# Altium PCB TL-WR703N.PcbDoc (part 2 of 3)
Units mm, origin at the board's own origin, x right, y up, seen from the top; angles counter-clockwise.
Board outline 48.52 x 50.08 mm, 2 copper layers (Top, Bottom); 241 components, 226 nets, 742 pads, 501 vias.
Unrouted connection lines stored in the file: 88.
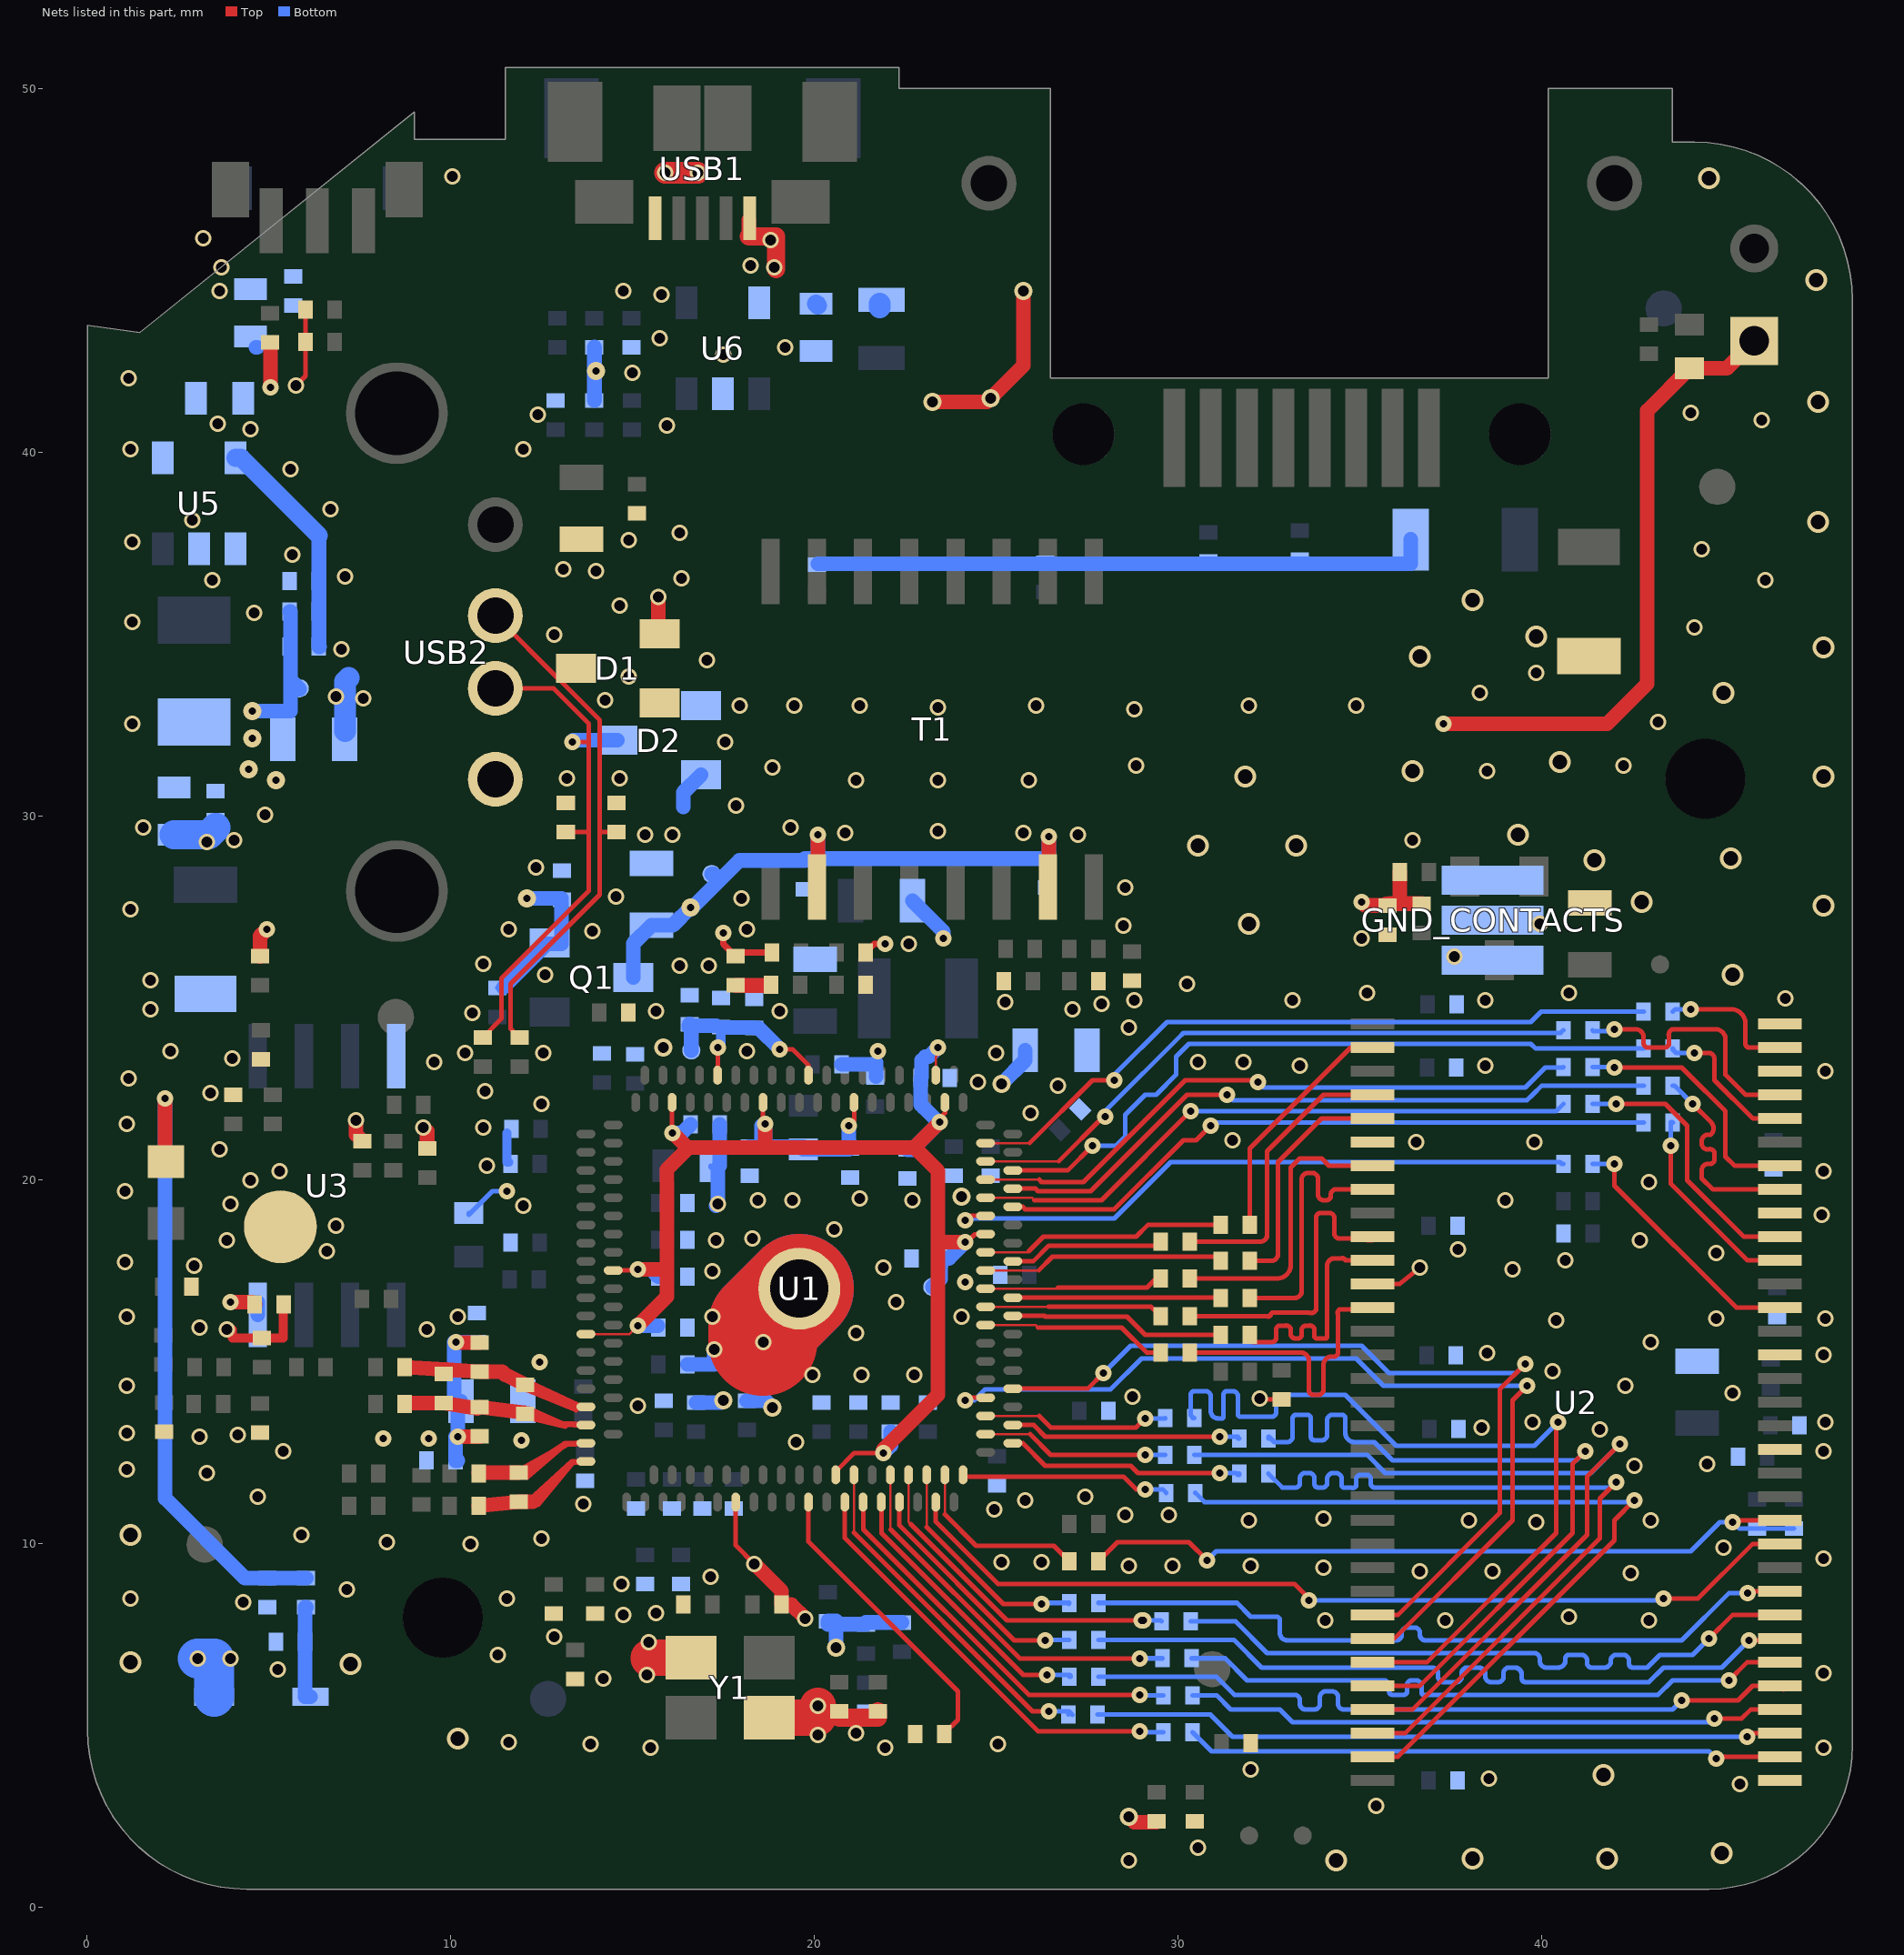
[diagram p2: the nets of this part, all layers, seen from the top]

## Via types
v1: diameter 0.45, hole 0.3, Top to Bottom, 286 vias
v2: diameter 0.45, hole 0.2, Top to Bottom, 152 vias
v3: diameter 0.6, hole 0.4, Top to Bottom, 31 vias
v4: diameter 0.5, hole 0.2, Top to Bottom, 21 vias
v5: diameter 0.5, hole 0.3, Top to Bottom, 11 vias

## Nets (pads, with @x,y where several pads share a name; then routed paths per layer and width w, separated by ;. In a path a pad name is that pad's centre, name@x,y a point inside that pad or via, vN(x,y) a via of type N, cw(c..) or ccw(c..) an arc to the next point about the centre after c; other vN are vias at no path point) (continued)
$28: C52.2 R78.1 R79.2 | length 2.5
  Top w0.127: C52.2@17.849,26.136 17.849,26.132 C52.2@17.861,26.132
  Top w0.175: v2(17.511,26.782) 17.511,26.474 C52.2@17.849,26.136 ; C52.2@17.861,26.132 17.973,26.244 R78.1@18.846,26.244 ; R79.2@21.42,26.244 21.658,26.482 v2(21.961,26.482)
+1V2: C67.2 C71.2 C73.1 C74.2 C75.1 C76.1 C77.2 C78.2 C83.1 R94.2 TP1V2.1 U1.A26 U1.A58 U1.B13 U1.B21 U1.B26 U1.B31 U1.B36 U1.B47 U1.B69 | length 48.1
  Top w0.064: U1.A58@13.731,15.75 14.929,15.75 v2(15.161,15.982) ; U1.A26@23.35,22.869 23.35,23.371 v2@23.461,23.482
  Top w0.127: U1.B47@14.481,17.5 15.179,17.5 15.211,17.532 v2(15.161,17.532) ; U1.B36@16.1,22.119 16.1,21.293 v2(16.111,21.282) ; U1.B31@18.561,22.08 U1.B31@18.6,22.119 18.6,21.593 v2(18.661,21.532) ; U1.B69@20.6,11.881 20.6,11.971 21.111,12.482 v2(21.911,12.482) ; v2(20.961,21.482) 21.111,21.632 U1.B26@21.111,21.982 ; U1.B26@21.1,22.119 21.1,21.993 U1.B26@21.111,21.982 ; U1.B26@21.111,22.132 U1.B26@21.111,21.982 ; 22.811,20.882 22.811,20.832 22.836,20.807 ; v2(23.411,23.632) 23.461,23.582 v2@23.461,23.482 ; v2(23.461,21.582) 23.361,21.582 23.611,21.832 23.611,22.132 23.611,22.13 U1.B21@23.6,22.119 ; v2(24.161,18.282) 24.211,18.282 24.421,18.492 24.711,18.492 24.711,18.482 24.719,18.49 U1.B13@24.719,18.5
  Top w0.406: v2(15.161,15.982) 15.961,16.782 15.961,17.432 ; v2(15.161,17.532) 15.211,17.532 15.961,17.532 15.961,17.432 ; v2(16.111,21.282) 16.511,20.882 16.561,20.882 ; v2(18.661,21.532) 18.661,20.882 ; v2(21.911,12.482) 21.911,12.582 23.411,14.082 23.411,18.282 ; 22.811,20.882 22.811,20.932 v2(23.461,21.582) ; 15.961,17.432 15.961,17.482 15.961,20.082 15.961,20.282 16.561,20.882 ; 16.561,20.882 18.661,20.882 ; 18.661,20.882 20.461,20.882 22.711,20.882 22.761,20.882 22.836,20.807 23.411,20.232 23.411,18.282 ; 23.411,18.282 v2(24.161,18.282) 23.411,18.282
  Bottom w0.127: C67.2@15.711,15.982 15.711,15.94 C67.2@15.721,15.93 ; C75.1@20.997,20.852 21.011,20.866 C75.1@21.011,20.882 ; 22.961,23.282 23.061,23.282 v2(23.411,23.632)
  Bottom w0.406: v2(15.161,15.982) C67.2@15.711,15.982 ; v2(15.161,17.532) 15.516,17.532 C78.2@15.721,17.327 ; v2(16.111,21.282) 16.374,21.282 C77.2@16.61,21.518 ; v2@18.561,21.482 18.561,20.902 ; 18.661,20.882 18.581,20.882 18.561,20.902 ; 18.661,20.882 v2(18.661,21.532) ; v2(20.961,21.482) C75.1@20.961,20.932 ; C75.1@21.011,20.982 21.011,20.882 C75.1@20.961,20.932 ; v2(21.911,12.482) 22.113,12.684 C71.2@22.113,13.067 ; C83.1@22.571,20.825 22.604,20.825 22.704,20.825 v2(23.461,21.582) 23.411,21.582 23.011,21.982 22.933,22.06 C74.2@22.933,22.788 22.961,22.816 22.961,23.282 ; 23.061,23.382 23.161,23.382 v2(23.411,23.632) ; TP1V2.1@23.256,17.046 23.479,17.269 C73.1@23.479,17.835 23.714,17.835 v2(24.161,18.282) ; 18.561,20.902 C76.1@18.23,20.902 18.561,20.902 ; 18.561,20.902 19.711,20.902 R94.2@19.711,20.832 20.961,20.832 C75.1@20.961,20.932
  other v2: 15.161,17.532 16.111,21.282
+2V0: C46.1 C47.1 C84.2 Q1.3 T1.2 T1.7 TP2V0.1 | length 18
  Top w0.406: T1.2@20.081,28.041 20.111,28.04 20.111,28.032 v2(20.111,29.482) ; T1.7@26.431,28.041 26.461,28.04 26.461,28.032 26.461,28.776 v2(26.461,29.432)
  Bottom w0.406: Q1.3@15.035,25.555 15.035,26.49 C84.2@15.536,26.991 16.12,26.991 v4(16.611,27.482) ; v4@16.611,27.432 v4(16.611,27.482) ; TP2V0.1@17.187,28.399 17.244,28.399 17.244,28.349 17.386,28.207 ; v2(20.111,29.482) 20.111,28.832 ; v2(26.461,29.432) 26.461,28.776 26.461,28.826 C46.1@26.404,28.826 20.111,28.826 20.111,28.832 ; v4(16.611,27.482) 16.661,27.482 17.386,28.207 ; 17.386,28.207 17.955,28.776 C47.1@19.75,28.776 19.75,28.832 19.761,28.832 20.111,28.832
+2V5: C94.2 C95.2 C101.2 R2.1 R3.1 R14.2 R82.1 TP2V5.1 U1.A33 U1.A38 | length 10.1
  Top w0.127: U1.A38@17.35,22.869 17.35,22.882 17.361,22.882 v2(17.361,23.632) ; v2(19.061,23.582) 19.411,23.582 19.85,23.143 U1.A33@19.85,22.869 ; R82.1@29.411,2.332 29.425,2.346 R82.1@29.425,2.349
  Top w0.406: v5(28.661,2.482) 28.811,2.332 R82.1@29.411,2.332
  Bottom w0.127: C101.2@16.579,24.27 16.611,24.27 C101.2@16.611,24.232 ; C95.2@17.311,24.232 17.441,24.232 C95.2@17.441,24.193 17.441,24.182 C95.2@17.461,24.182
  Bottom w0.254: v2(17.361,23.632) 17.441,23.632 C95.2@17.441,24.193
  Bottom w0.406: C101.2@16.561,24.193 16.561,24.232 16.611,24.232 C95.2@17.311,24.232 ; C101.2@16.579,24.27 16.629,24.22 TP2V5.1@16.629,23.55 ; C95.2@17.461,24.182 18.357,24.182 C94.2@18.357,24.166 18.477,24.166 v2(19.061,23.582) ; R14.2@20.385,7.771 R14.2@20.385,7.86 R14.2@20.611,7.86 ; v5(20.611,7.132) R14.2@20.611,7.86 ; R2.1@22.417,7.821 21.428,7.821 21.428,7.771 20.611,7.771 R14.2@20.611,7.86
+3V3: C4.2 C7.1 C18.1 C24.1 C38.2 C70.2 C85.2 C92.2 C106.2 C109.2 C110.1 C111.1 D1.2 D2.2 L2.1 L4.2 L14.1 LED2.A LED3.A Q1.2 R62.1 R91.1 R93.2 R95.1 R96.2 R97.2 R98.2 R99.2 R106.2 R108.2 R109.1 TP3V3.1 U3.8 | length 48.1
  Top w0.127: R91.1@5.011,42.982 5.041,43.012 R91.1@5.049,43.012 5.061,43 R91.1@5.061,42.982 ; L2.1@10.811,12.932 10.814,12.932 L2.1@10.814,12.94
  Top w0.406: v2(3.961,16.632) 4.563,16.632 C7.1@4.626,16.569 ; R62.1@4.772,26.136 4.772,26.693 v2(4.961,26.882) ; R91.1@5.011,42.982 R91.1@5.019,42.982 ; v2(5.061,41.782) R91.1@5.061,42.982 ; v2(10.161,15.532) 10.161,15.518 L4.2@10.814,15.518 ; v2@10.203,12.94 v2(10.211,12.932) L2.1@10.811,12.932 ; v1(15.719,36.022) 15.719,35.033 D1.2@15.753,34.999 ; v2(35.061,27.632) 35.16,27.533 C92.2@35.775,27.533 ; C92.2@35.726,27.582 C92.2@35.775,27.533 ; R106.2@36.11,28.453 36.11,27.582 35.761,27.582 35.775,27.568 C92.2@35.775,27.533 ; R98.2@36.714,27.583 35.825,27.583 C92.2@35.775,27.533 ; v2(37.311,32.532) 41.811,32.532 42.911,33.632 42.911,41.139 LED3.A@44.076,42.304 45.1,42.304 LED2.A@45.854,43.058
  Bottom w0.127: C106.2@5.588,34.649 5.588,34.709 C106.2@5.611,34.732 ; TP3V3.1@5.861,33.482 TP3V3.1@5.861,33.506 ; R95.1@10.511,19.082 10.511,19.032 11.161,19.682 v2(11.561,19.682) ; R93.2@11.295,25.27 11.295,25.282 R93.2@11.461,25.282 ; Q1.2@12.735,26.505 12.735,26.482 Q1.2@12.811,26.482 ; C70.2@13.061,27.732 13.073,27.732 C70.2@13.073,27.695 ; R97.2@16.756,13.867 R97.2@16.761,13.872 ; R97.2@16.761,13.872 16.761,13.882 R97.2@16.761,13.872
  Bottom w0.406: v2(3.961,16.632) 4.706,16.632 U3.8@4.706,16.276 ; v4(4.561,32.882) 5.611,32.882 5.611,33.732 ; R99.2@5.588,35.615 5.611,35.615 5.611,34.732 5.611,33.732 ; TP3V3.1@5.861,33.482 5.611,33.732 ; C85.2@10.161,13.898 C85.2@10.295,13.898 ; C24.1@10.211,12.274 C24.1@10.148,12.274 10.148,12.932 v2(10.211,12.932) C85.2@10.211,13.898 ; C18.1@10.737,15.53 10.737,15.532 v2(10.161,15.532) 10.111,15.532 10.111,13.898 C85.2@10.295,13.898 ; R93.2@11.461,25.282 12.661,26.482 12.811,26.482 13.061,26.482 13.061,27.632 13.061,27.732 v4(12.111,27.732) ; R108.2@13.962,41.422 13.962,42.183 v4(14.011,42.232) 13.962,42.281 R109.1@13.962,42.885 ; 16.41,30.242 16.41,30.642 D2.2@16.894,31.127 ; R97.2@16.756,13.867 17.446,13.867 v5(17.511,13.932) ; R96.2@18.153,13.917 18.676,13.917 v5(18.861,13.732) ; C38.2@22.709,27.664 23.561,26.812 v2(23.561,26.632) ; v5(25.161,22.632) 25.808,23.279 C4.2@25.808,23.55 ; C85.2@10.211,13.898 C85.2@10.295,13.898 ; C85.2@10.211,13.898 C85.2@10.295,13.898
  other v4: 5.211,30.982 4.461,31.282 4.561,32.132
+5V0: C107.2 C108.2 C112.1 C119.1 R113.1 U5.1 U5.4 U6.5 USB1.VBUS | length 2.3
  Top w0.406: USB1.VBUS@18.211,45.932 USB1.VBUS@18.211,46.382
  Top w0.5: USB1.VBUS@18.211,45.932 18.961,45.932 v1@18.961,45.032
  Bottom w0.406: 4.661,42.882 4.688,42.882
  Bottom w0.5: C119.1@20.061,44.082 C119.1@20.111,44.032
  Bottom w0.6: R113.1@21.811,43.982 R113.1@21.811,44.082
  other v1: 18.911,45.082 18.261,45.132 18.811,45.832
A0: R22.1 U1.A4 | length 6.4
  Top w0.127: U1.A4@25.469,13.25 26.043,13.25 26.361,12.932 v2(31.161,12.932)
  Bottom w0.127: v2(31.161,12.932) 31.661,12.932 31.661,12.882 R22.1@31.692,12.882
A0_B: R22.2 U2.29 | length 21.2
  Top w0.127: U2.29@35.355,6.075 36.654,6.075 40.861,10.282 40.861,12.182 v2(41.211,12.532)
  Bottom w0.127: R22.2@32.492,12.882 32.492,12.932 32.511,12.932 32.661,12.782 33.011,12.782 ccw(c33.011,12.932) 33.161,12.932 33.161,13.432 cw(c33.261,13.432) 33.261,13.532 33.561,13.532 cw(c33.561,13.432) 33.661,13.432 33.661,12.932 ccw(c33.761,12.932) 33.761,12.832 33.961,12.832 ccw(c33.961,12.982) 34.111,12.982 34.111,13.382 cw(c34.261,13.382) 34.261,13.532 34.511,13.532 cw(c34.511,13.432) 34.611,13.432 34.611,13.032 ccw(c34.861,13.032) 34.861,12.782 34.911,12.782 35.411,12.782 35.911,12.282 40.961,12.282 v2(41.211,12.532)
A1: R24.1 U1.B2 | length 5.2
  Top w0.064: U1.B2@24.719,13 25.943,13
  Top w0.127: 25.943,13 26.511,12.432 v2(29.111,12.432)
  Bottom w0.127: v2(29.111,12.432) 29.66,12.432 R24.1@29.66,12.424 R24.1@29.652,12.432
A1_B: R24.2 U2.30 | length 23
  Top w0.127: U2.30@35.355,5.425 36.454,5.425 41.261,10.232 41.261,11.832 v2(42.161,12.732)
  Bottom w0.127: R24.2@30.46,12.424 35.219,12.424 35.319,12.324 35.611,12.032 35.711,11.932 36.361,11.932 41.361,11.932 v2(42.161,12.732)
A2: R26.1 U1.A3 | length 6.6
  Top w0.127: U1.A3@25.469,12.75 25.743,12.75 26.361,12.132 28.711,12.132 28.911,11.932 31.111,11.932 v2(31.161,11.932)
  Bottom w0.127: v2(31.161,11.932) 31.611,11.932 31.661,11.882 31.692,11.882 R26.1@31.692,11.916
A2_B: R26.2 U2.31 | length 21.7
  Top w0.127: U2.31@35.355,4.775 36.254,4.775 41.611,10.132 41.611,11.232 v2(42.061,11.682)
  Bottom w0.127: R26.2@32.492,11.916 32.876,11.532 33.261,11.532 ccw(c33.236,11.657) 33.361,11.682 33.361,11.782 cw(c33.511,11.782) 33.511,11.932 33.611,11.932 cw(c33.611,11.782) 33.761,11.782 33.761,11.632 ccw(c33.861,11.632) 33.861,11.532 33.911,11.532 ccw(c33.961,11.682) 34.111,11.632 34.111,11.732 cw(c34.286,11.757) 34.261,11.932 34.361,11.932 cw(c34.336,11.757) 34.511,11.732 34.511,11.682 34.511,11.582 ccw(c34.586,11.607) 34.611,11.532 34.761,11.532 ccw(c34.811,11.632) 34.911,11.582 34.911,11.732 cw(c35.036,11.757) 35.011,11.882 35.211,11.882 cw(c35.186,11.757) 35.311,11.732 35.311,11.632 ccw(c35.411,11.632) 35.411,11.532 41.911,11.532 v2(42.061,11.682)
A3: R28.1 U1.B76 | length 5.8
  Top w0.127: U1.B76@24.1,11.832 U1.B76@24.1,11.881 24.149,11.832 28.511,11.832 28.861,11.482 28.911,11.482 v2(29.111,11.482)
  Bottom w0.127: v2(29.111,11.482) 29.59,11.482 R28.1@29.687,11.385
A3_B: R28.2 U2.32 | length 22.7
  Top w0.127: U2.32@35.355,4.125 35.355,4.132 36.061,4.132 42.011,10.082 42.011,10.632 v2(42.561,11.182)
  Bottom w0.127: R28.2@30.487,11.385 30.74,11.132 42.261,11.132 42.511,11.132 v2(42.561,11.182)
A4: R30.1 U1.A80 | length 12
  Top w0.127: U1.A80@20.85,11.131 20.85,10.143 26.161,4.832 v2(28.961,4.832)
  Bottom w0.127: v2(28.961,4.832) 28.989,4.804 R30.1@29.61,4.804
A4_B: R30.2 U2.35 | length 16.5
  Top w0.127: v2(44.811,4.082) 44.854,4.125 U2.35@46.555,4.125
  Bottom w0.127: R30.2@30.41,4.804 30.932,4.282 43.911,4.282 44.611,4.282 v2(44.811,4.082)
A5: R32.1 U1.B70 | length 9.8
  Top w0.064: 21.1,10.293 U1.B70@21.1,11.881
  Top w0.127: 21.1,10.293 26.011,5.382 v2(26.461,5.382)
  Bottom w0.127: v2(26.461,5.382) R32.1@27.011,5.382 ; R32.1@26.997,5.289 26.997,5.368 R32.1@27.011,5.382 ; R32.1@27.111,5.282 R32.1@27.011,5.382
A5_B: R32.2 U2.36 | length 19
  Top w0.127: v2(45.661,4.682) 45.754,4.775 U2.36@46.555,4.775
  Bottom w0.127: R32.2@27.797,5.289 30.904,5.289 30.911,5.282 31.511,4.682 v2(45.661,4.682)
A6: R34.1 U1.A81 | length 10.9
  Top w0.127: U1.A81@21.35,11.131 21.361,11.12 21.361,10.382 25.911,5.832 v2(28.961,5.832)
  Bottom w0.127: R34.1@29.61,5.82 v2@28.973,5.82 ; v2@28.973,5.82 v2(28.961,5.832) v2@28.973,5.82
A6_B: R34.2 U2.37 | length 16.6
  Top w0.127: v2(44.761,5.182) 45.511,5.182 45.754,5.425 U2.37@46.555,5.425
  Bottom w0.127: R34.2@30.41,5.82 31.073,5.82 31.461,5.432 32.811,5.432 33.161,5.082 44.661,5.082 v2(44.761,5.182)
A7: R36.1 U1.A82 | length 7.7
  Top w0.127: U1.A82@21.85,11.131 U1.A82@21.86,11.131 ; v2(26.411,6.382) 25.761,6.382 21.861,10.282 U1.A82@21.861,11.132 ; U1.A82@21.86,11.131 U1.A82@21.861,11.132
  Bottom w0.127: v2(26.411,6.382) 27.011,6.382 cw(c27.011,6.332) 27.061,6.332 27.057,6.328 R36.1@27.02,6.328
A7_B: R36.2 U2.38 | length 20.6
  Top w0.127: v2(43.861,5.682) 45.411,5.682 45.761,6.032 45.811,6.082 46.561,6.082 46.561,6.032 U2.38@46.661,6.032 ; U2.38@46.555,6.075 46.661,6.075 U2.38@46.661,6.032 ; U2.38@46.661,5.982 U2.38@46.661,6.032
  Bottom w0.127: R36.2@27.82,6.328 31.065,6.328 31.561,5.832 33.211,5.832 cw(c33.211,5.682) 33.361,5.682 33.361,5.582 ccw(c33.511,5.582) 33.511,5.432 33.761,5.432 ccw(c33.761,5.582) 33.911,5.582 33.911,5.732 cw(c34.086,5.757) 34.061,5.932 34.211,5.932 cw(c34.236,5.757) 34.411,5.782 34.411,5.582 ccw(c34.561,5.582) 34.561,5.432 43.611,5.432 v2(43.861,5.682)
A8: R38.1 U1.B72 | length 10.4
  Top w0.064: U1.B72@22.1,11.881 22.1,10.393 22.111,10.382
  Top w0.127: 22.111,10.382 25.661,6.832 v2(28.961,6.832)
  Bottom w0.127: v2(28.961,6.832) 28.965,6.836 R38.1@29.583,6.836
A8_B: R38.2 U2.39 | length 17.7
  Top w0.127: v2(45.161,6.232) 45.654,6.725 U2.39@46.555,6.725
  Bottom w0.127: R38.2@30.383,6.836 31.307,6.836 31.911,6.232 35.661,6.232 cw(c35.661,6.082) 35.811,6.082 35.811,5.932 ccw(c35.911,5.932) 35.911,5.832 36.211,5.832 ccw(c36.211,5.932) 36.311,5.932 36.311,6.082 cw(c36.436,6.107) 36.411,6.232 36.561,6.232 cw(c36.536,6.057) 36.711,6.032 36.711,5.882 ccw(c36.761,5.882) 36.761,5.832 43.211,5.832 43.611,6.232 v2(45.161,6.232)
A9: R40.1 U1.A83 | length 6.6
  Top w0.127: U1.A83@22.35,11.131 22.35,10.493 25.511,7.332 v2(26.361,7.332)
  Bottom w0.127: v2(26.361,7.332) 26.349,7.344 R40.1@27.02,7.344
A9_B: R40.2 U2.40 | length 20.9
  Top w0.127: v2(45.711,7.332) 46.461,7.332 46.555,7.332 U2.40@46.555,7.375
  Bottom w0.127: R40.2@27.82,7.344 31.549,7.344 32.311,6.582 37.011,6.582 cw(c36.986,6.407) 37.161,6.382 37.161,6.332 ccw(c37.311,6.332) 37.311,6.182 37.661,6.182 ccw(c37.661,6.332) 37.811,6.332 37.811,6.432 cw(c37.961,6.432) 37.961,6.582 38.261,6.582 cw(c38.261,6.382) 38.461,6.382 38.461,6.332 ccw(c38.611,6.332) 38.611,6.182 38.811,6.182 ccw(c38.811,6.332) 38.961,6.332 38.961,6.432 cw(c39.111,6.432) 39.111,6.582 39.261,6.582 cw(c39.261,6.382) 39.461,6.382 39.461,6.282 ccw(c39.561,6.282) 39.561,6.182 42.961,6.182 43.361,6.582 44.961,6.582 v2(45.711,7.332)
A10/AP: R42.1 U1.B3 | length 5.2
  Top w0.064: U1.B3@24.719,13.5 26.193,13.5
  Top w0.127: 26.193,13.5 26.511,13.182 28.861,13.182 v2(29.111,13.432)
  Bottom w0.127: v2(29.111,13.432) 29.561,13.432 29.66,13.432 R42.1@29.66,13.44
A10_B/AP_B: R42.2 U2.28 | length 23.6
  Top w0.127: U2.28@35.355,6.725 36.854,6.725 40.411,10.282 40.411,13.282 v2(40.461,13.332)
  Bottom w0.127: R42.2@30.46,13.44 30.411,13.44 30.411,13.482 cw(c30.411,13.532) 30.361,13.532 30.361,14.082 cw(c30.461,14.082) 30.461,14.182 30.761,14.182 cw(c30.761,14.032) 30.911,14.032 30.911,13.632 ccw(c31.111,13.632) 31.111,13.432 31.211,13.432 ccw(c31.211,13.482) 31.261,13.482 31.261,14.082 cw(c31.361,14.082) 31.361,14.182 31.511,14.182 cw(c31.511,14.032) 31.661,14.032 31.661,13.532 ccw(c31.711,13.532) 31.711,13.482 32.561,13.482 ccw(c32.586,13.607) 32.711,13.582 32.711,13.782 cw(c33.011,13.782) 33.011,14.082 34.611,14.082 36.011,12.682 39.811,12.682 v2(40.461,13.332)
A11: R44.1 U1.B73 | length 9.4
  Top w0.064: U1.B73@22.6,11.881 22.6,10.593 22.661,10.532
  Top w0.127: 22.661,10.532 25.311,7.882 v2(29.061,7.882)
  Bottom w0.127: v2(29.011,7.882) v2(29.061,7.882) 29.53,7.882 R44.1@29.56,7.852
A11_B: R44.2 U2.41 | length 18.3
  Top w0.127: v2(44.611,7.382) 45.254,8.025 U2.41@46.555,8.025
  Bottom w0.127: R44.2@30.36,7.852 31.591,7.852 32.461,6.982 39.661,6.982 39.811,6.982 cw(c39.786,6.807) 39.961,6.782 39.961,6.732 ccw(c40.136,6.757) 40.161,6.582 40.461,6.582 ccw(c40.461,6.782) 40.661,6.782 40.661,6.832 cw(c40.761,6.832) 40.761,6.932 41.061,6.932 cw(c41.086,6.757) 41.261,6.782 41.261,6.732 ccw(c41.386,6.707) 41.361,6.582 41.761,6.582 ccw(c41.736,6.757) 41.911,6.782 cw(c42.061,6.782) 42.061,6.932 42.211,6.932 cw(c42.236,6.757) 42.411,6.782 42.411,6.682 ccw(c42.511,6.682) 42.511,6.582 42.911,6.582 43.261,6.932 44.161,6.932 v2(44.611,7.382)
A12: R46.1 U1.B74 | length 6.3
  Top w0.064: 23.1,10.443 U1.B74@23.1,11.881
  Top w0.127: 23.1,10.443 25.211,8.332 v2(26.261,8.332)
  Bottom w0.127: v2(26.261,8.332) 26.289,8.36 26.983,8.36 27.011,8.332 27.011,8.351 R46.1@27.02,8.36
A12_B: R46.2 U2.42 | length 20.4
  Top w0.127: v2(45.668,8.625) 45.661,8.625 45.661,8.632 45.704,8.675 U2.42@46.555,8.675
  Bottom w0.127: R46.2@27.82,8.36 31.633,8.36 32.011,7.982 32.711,7.982 cw(c32.711,7.882) 32.811,7.882 32.811,7.532 ccw(c33.011,7.532) 33.011,7.332 36.011,7.332 ccw(c36.011,7.482) 36.161,7.482 36.161,7.532 cw(c36.311,7.532) 36.311,7.682 36.511,7.682 cw(c36.511,7.532) 36.661,7.532 36.661,7.482 ccw(c36.811,7.482) 36.811,7.332 36.861,7.332 43.861,7.332 45.154,8.625 v2(45.668,8.625)
ANT1: AN1.RF C29.2 C32.2 | length 2.6
  Bottom w0.406: C29.2@6.038,8.241 6.007,8.241 C32.2@6.007,7.294 6.007,5.782 AN1.RF@6.161,5.782
ANT1_INN: C33.2 L8.1 U1.A64 | length 6.3
  Top w0.127: C33.2@11.88,11.939 11.961,11.939 C33.2@11.961,12.032
  Top w0.175: C33.2@12.011,11.982 13.161,12.732 12.111,11.832 11.961,12.032 13.211,12.732 U1.A64@13.731,12.75
  Top w0.406: L8.1@10.783,11.92 10.783,11.939 L8.1@10.868,11.939 ; L8.1@10.861,11.932 L8.1@10.868,11.939 ; C33.2@11.88,11.939 L8.1@10.868,11.939
ANT1_INP: C33.1 L6.1 U1.A65 | length 7.2
  Top w0.127: C33.1@11.88,11.139 11.88,11.182 12.211,11.182
  Top w0.175: 12.411,11.082 13.361,12.232 ; U1.A65@13.731,12.25 13.361,12.232 ; 13.361,12.232 12.211,11.032 12.211,11.182 13.361,12.232
  Top w0.406: L6.1@10.783,11.031 11.941,11.139 C33.1@11.88,11.139 12.268,11.139
ANT1_INT: C29.1 C31.1 J1.2 | length 17.7
  Top w0.406: v2(2.161,22.232) 2.161,20.49 J1.2@2.182,20.49
  Bottom w0.406: v2@2.161,22.132 2.161,21.982 ; v2(2.161,22.232) 2.161,21.982 ; C31.1@5.061,9.032 C31.1@5.07,9.041 ; C29.1@6.038,9.041 C31.1@5.07,9.041 ; 2.161,21.982 2.161,11.232 4.352,9.041 4.972,9.041 C31.1@5.07,9.041
ANT1_OUTN: C22.2 C23.2 C25.2 L4.1 U1.A62 | length 9
  Top w0.127: C22.2@12.011,14.382 12.027,14.382 C22.2@12.057,14.352 12.07,14.352 C22.2@12.071,14.353
  Top w0.175: U1.A62@13.731,13.75 13.511,13.782 12.011,14.482 12.111,14.232 13.461,13.682 12.071,14.353 C22.2@12.011,14.382 ; C22.2@12.011,14.382 12.011,14.432 C22.2@12.011,14.382
  Top w0.406: C25.2@8.751,14.841 C23.2@9.916,14.772 ; C23.2@9.825,14.656 9.916,14.656 C23.2@9.916,14.772 ; C22.2@12.011,14.382 11.511,14.632 11.425,14.718 L4.1@10.814,14.718 C23.2@9.916,14.772
ANT1_OUTP: C19.2 C22.1 C23.1 L2.2 U1.A63 | length 7.5
  Top w0.127: C22.1@12.057,13.552 12.057,13.582 C22.1@12.111,13.582
  Top w0.175: C22.1@12.111,13.582 13.161,13.232 12.111,13.482 12.161,13.682 13.061,13.282 U1.A63@13.731,13.25
  Top w0.406: C19.2@8.751,13.825 8.751,13.856 C23.1@9.825,13.856 10.748,13.706 10.814,13.74 12.019,13.59 C22.1@12.057,13.552
BA0: U1.A6 U2.26 | length 24.1
  Top w0.127: U1.A6@25.469,14.25 27.529,14.25 v2(27.961,14.682) ; U2.26@35.355,8.025 36.054,8.025 38.861,10.832 38.861,14.232 v2(39.561,14.932)
  Bottom w0.127: v2(27.961,14.682) 28.711,15.432 35.061,15.432 35.811,14.682 38.461,14.682 39.311,14.682 v2(39.561,14.932)
BA1: U1.B4 U2.27 | length 25.9
  Top w0.127: v2(24.161,13.932) 24.229,14 U1.B4@24.719,14 ; U2.27@35.355,7.375 35.954,7.375 39.211,10.632 39.211,13.932 v2(39.611,14.332)
  Bottom w0.127: v2(24.161,13.932) 24.411,13.932 24.711,14.232 28.161,14.232 29.011,15.082 34.911,15.082 35.661,14.332 v2(39.611,14.332)
CKE: U1.A85 U2.44 | length 25.3
  Top w0.127: U1.A85@23.35,11.131 23.35,10.593 25.061,8.882 33.211,8.882 33.611,8.482 v2(33.611,8.432) ; v2(43.361,8.482) 44.311,8.482 45.704,9.875 45.804,9.975 U2.44@46.555,9.975
  Bottom w0.127: v2(33.611,8.432) 43.361,8.432 v2(43.361,8.482)
CLK: R56.1 U1.B75 | length 5
  Top w0.064: 23.6,10.793 U1.B75@23.6,11.881
  Top w0.127: 23.6,10.793 24.461,9.932 26.595,9.932 R56.1@27.02,9.507
CLK_B: C6.1 R55.1 R56.2 U2.45 | length 21.4
  Top w0.127: R56.2@27.82,9.507 28.345,10.032 30.311,10.032 v2(30.811,9.532) ; v2(45.261,10.582) 45.304,10.625 U2.45@46.555,10.625
  Bottom w0.127: v2(30.811,9.532) 31.061,9.782 31.161,9.782 43.761,9.782 44.111,9.782 44.911,10.582 45.111,10.582 v2(45.261,10.582) 45.443,10.4 C6.1@45.931,10.4 R55.1@46.947,10.4
D+: D2.3 R101.1 R104.1 USB2.3 | length 15.3
  Top w0.127: R101.1@10.891,23.9 11.411,24.42 11.411,25.532 13.811,27.932 13.811,29.55 ; USB2.3@11.241,33.502 12.841,33.502 13.811,32.532 13.811,31.982 ; R104.1@13.177,29.55 13.811,29.55 ; v2(13.361,32.032) 13.811,32.032 13.811,31.982 ; 13.811,29.55 13.811,29.582 ; 13.811,29.55 13.811,29.582 ; 13.811,29.582 13.811,29.65 13.811,31.982
  Bottom w0.406: v2(13.361,32.032) 13.356,32.037 13.343,32.037 13.382,32.077 D2.3@14.594,32.077
D-: D1.3 R102.1 R103.1 USB2.2 | length 15.4
  Top w0.127: USB2.2@11.241,35.502 D1.3@13.011,33.732 ; R102.1@11.907,23.9 11.661,24.146 11.661,25.382 14.111,27.832 14.111,29.582 ; D1.3@13.361,33.982 13.511,33.982 13.011,33.982 D1.3@13.011,33.732 ; R103.1@14.574,29.55 14.111,29.55 14.111,29.582 ; D1.3@13.011,33.732 13.036,33.707 14.111,32.632 14.111,32.582 14.111,29.582
  Top w0.406: D1.3@13.511,33.982 D1.3@13.511,34.041
DQ0: R21.2 U1.B12 | length 6.8
  Top w0.064: U1.B12@24.719,18 25.879,18 25.911,18.032
  Top w0.127: 25.911,18.032 26.311,18.432 28.861,18.432 29.18,18.751 R21.2@31.184,18.751
DQ0_B: R21.1 U2.2 | length 6.6
  Top w0.127: R21.1@31.984,18.751 31.984,20.855 34.761,23.632 35.311,23.632 35.318,23.625 U2.2@35.355,23.625
DQ1: R23.2 U1.A13 | length 4.3
  Top w0.127: U1.A13@25.469,17.75 26.029,17.75 26.461,18.182 29.422,18.182 R23.2@29.533,18.293
DQ1_B: R23.1 U2.4 | length 8.4
  Top w0.127: R23.1@30.333,18.293 32.272,18.293 ccw(c32.272,18.482) 32.461,18.482 32.461,20.782 33.961,22.282 34.011,22.332 U2.4@35.011,22.332 ; U2.4@35.355,22.325 U2.4@35.361,22.331 ; U2.4@35.011,22.332 35.361,22.332 U2.4@35.011,22.332
DQ2: R25.2 U1.B11 | length 6.7
  Top w0.064: U1.B11@24.719,17.5 26.179,17.5
  Top w0.127: 26.179,17.5 26.561,17.882 31.064,17.882 R25.2@31.184,17.762
DQ2_B: R25.1 U2.5 | length 6.9
  Top w0.127: R25.1@31.984,17.762 32.591,17.762 ccw(c32.566,17.957) 32.761,17.982 32.761,20.482 33.961,21.682 U2.5@35.011,21.682 ; U2.5@35.355,21.675 U2.5@35.361,21.681 ; U2.5@35.011,21.682 U2.5@35.361,21.682 ; U2.5@35.011,21.682 35.261,21.682 35.311,21.682 U2.5@35.361,21.682
DQ3: R27.2 U1.B10 | length 4.9
  Top w0.064: U1.B10@24.719,17 26.679,17 26.711,17.032
  Top w0.127: 26.711,17.032 29.161,17.032 29.406,17.277 R27.2@29.533,17.277
DQ3_B: R27.1 U2.7 | length 8.1
  Top w0.127: R27.1@30.333,17.277 32.706,17.277 ccw(c32.731,17.657) 33.111,17.632 33.111,20.332 33.361,20.582 33.961,20.582 34.161,20.382 34.168,20.375 U2.7@35.355,20.375
DQ4: R29.2 U1.A11 | length 5.7
  Top w0.127: U1.A11@25.469,16.75 31.18,16.75 R29.2@31.184,16.746
DQ4B: R29.1 U2.8 | length 7.8
  Top w0.127: R29.1@31.984,16.746 33.225,16.746 ccw(c33.225,16.932) 33.411,16.932 33.411,20.032 cw(c33.586,20.007) 33.611,20.182 33.711,20.182 cw(c33.686,20.007) 33.861,19.982 33.861,19.582 ccw(c34.011,19.582) 34.011,19.432 34.111,19.432 ccw(c34.086,19.557) 34.211,19.582 cw(c34.361,19.582) 34.361,19.732 U2.8@35.011,19.732 ; U2.8@35.355,19.725 35.348,19.732 U2.8@35.011,19.732 ; U2.8@35.361,19.732 U2.8@35.011,19.732
DQ5: R31.2 U1.B9 | length 4.9
  Top w0.064: U1.B9@24.719,16.5 26.443,16.5 26.461,16.482
  Top w0.127: 26.443,16.5 29.271,16.5 R31.2@29.533,16.238
DQ5_B: R31.1 U2.10 | length 8.4
  Top w0.127: R31.1@30.333,16.238 32.467,16.238 ccw(c32.492,16.307) 32.561,16.282 cw(c32.617,16.282) 32.617,16.338 32.667,16.338 33.617,16.338 ccw(c33.667,16.482) 33.811,16.432 33.811,18.932 cw(c33.936,18.957) 33.911,19.082 34.161,19.082 cw(c34.161,18.932) 34.311,18.932 34.311,18.482 ccw(c34.461,18.532) 34.511,18.382 35.161,18.382 cw(c35.161,18.332) 35.211,18.332 35.355,18.332 U2.10@35.355,18.425
DQ6: R33.2 U1.A10 | length 5.9
  Top w0.127: U1.A10@25.469,16.25 26.343,16.25 26.361,16.232 28.611,16.232 29.111,15.732 29.113,15.73 R33.2@31.184,15.73
DQ6_B: R33.1 U2.11 | length 6.8
  Top w0.127: R33.1@31.984,15.73 31.984,15.655 31.961,15.632 32.061,15.532 32.261,15.532 32.611,15.532 ccw(c32.586,15.657) 32.711,15.682 32.711,15.882 cw(c32.811,15.882) 32.811,15.982 32.961,15.982 cw(c32.986,15.857) 33.111,15.882 33.111,15.782 ccw(c33.236,15.757) 33.211,15.632 33.311,15.632 ccw(c33.311,15.732) 33.411,15.732 33.411,15.832 cw(c33.536,15.857) 33.511,15.982 33.611,15.982 cw(c33.636,15.857) 33.761,15.882 33.761,15.732 ccw(c33.836,15.707) 33.811,15.632 34.061,15.632 ccw(c34.061,15.682) 34.111,15.682 34.111,17.632 cw(c34.311,17.632) 34.311,17.832 34.511,17.832 cw(c34.536,17.757) 34.611,17.782 34.611,17.775 U2.11@35.355,17.775
DQ7: R35.2 U1.B8 | length 5.1
  Top w0.064: U1.B8@24.719,16 26.093,16 26.161,15.932
  Top w0.127: 26.161,15.932 28.461,15.932 29.148,15.245 R35.2@29.533,15.245
DQ7_B: R35.1 U2.13 | length 8.2
  Top w0.127: R35.1@30.333,15.245 33.398,15.245 cw(c33.373,15.007) 33.611,14.982 33.611,14.182 ccw(c33.736,14.207) 33.761,14.082 33.861,14.082 ccw(c33.861,14.232) 34.011,14.232 34.011,14.932 cw(c34.236,14.907) 34.261,15.132 ccw(c34.286,15.257) 34.411,15.232 34.411,16.282 cw(c34.511,16.332) 34.461,16.432 35.161,16.432 ccw(c35.161,16.482) 35.211,16.482 35.355,16.482 U2.13@35.355,16.475
DQ8: R37.1 U1.B14 | length 17.7
  Top w0.127: v2(24.161,18.882) 24.279,19 U1.B14@24.719,19
  Bottom w0.127: v2(24.161,18.882) 24.211,18.932 28.261,18.932 29.811,20.482 40.511,20.482 40.561,20.432 40.598,20.432 R37.1@40.605,20.425
DQ8_B: R37.2 U2.54 | length 7.2
  Top w0.127: v2(42.011,20.432) 42.011,19.832 45.361,16.482 ; U2.54@46.555,16.475 45.368,16.475 ; 45.361,16.482 45.368,16.475 ; 45.361,16.482 45.368,16.475 ; 45.361,16.482 45.368,16.475
  Bottom w0.127: R37.2@41.405,20.425 v2@42.004,20.425 ; v2(42.011,20.432) v2@42.004,20.425 ; v2(42.011,20.432) v2@42.004,20.425
DQ9: R39.1 U1.A16 | length 18.4
  Top w0.127: U1.A16@25.469,19.25 25.743,19.25 25.811,19.182 28.261,19.182 30.161,21.082 30.511,21.082 v2(30.911,21.482)
  Bottom w0.127: v2(30.911,21.482) 30.961,21.482 31.047,21.568 R39.1@42.814,21.568
DQ9_B: R39.2 U2.56 | length 5.6
  Top w0.127: v2(43.561,20.932) 43.561,20.832 43.561,19.882 45.668,17.775 U2.56@46.555,17.775
  Bottom w0.127: v2(43.561,20.932) 43.561,21.582 43.6,21.582 R39.2@43.614,21.568
DQ10: R41.1 U1.B15 | length 17
  Top w0.064: U1.B15@24.719,19.5 25.993,19.5 26.061,19.432
  Top w0.127: 26.061,19.432 27.911,19.432 v2(30.361,21.882)
  Bottom w0.127: v2(30.361,21.882) 30.461,21.882 40.211,21.882 40.411,21.882 R41.1@40.605,22.076
DQ10_B: R41.2 U2.57 | length 7.6
  Top w0.127: v2@42.061,22.082 43.411,22.082 44.011,21.482 44.011,19.982 45.568,18.425 U2.57@46.555,18.425
  Bottom w0.127: R41.2@41.405,22.076 v2@42.055,22.076 ; v2@42.055,22.076 v2(42.061,22.082) v2@42.055,22.076
DQ11: R43.1 U1.A17 | length 18.8
  Top w0.127: U1.A17@25.469,19.75 26.093,19.75 26.161,19.682 27.611,19.682 30.261,22.332 v2(31.361,22.332) v2@31.461,22.332
  Bottom w0.127: v2(31.361,22.332) 31.511,22.182 31.811,22.182 ; R43.1@42.814,22.584 40.013,22.584 39.761,22.332 39.611,22.182 32.161,22.182 31.861,22.182 ; 31.811,22.182 31.861,22.182 ; 31.811,22.182 31.861,22.182
DQ11_B: R43.2 U2.59 | length 6
  Top w0.127: v2(44.161,22.082) 44.661,21.582 cw(c44.486,21.407) 44.661,21.232 44.561,21.232 ccw(c44.586,21.057) 44.411,21.032 44.411,20.982 ccw(c44.561,20.982) 44.561,20.832 44.611,20.832 cw(c44.636,20.707) 44.761,20.732 44.761,20.532 cw(c44.636,20.557) 44.611,20.432 ccw(c44.586,20.257) 44.411,20.282 44.411,20.032 44.718,19.725 U2.59@46.555,19.725
  Bottom w0.127: R43.2@43.614,22.584 43.659,22.584 v2(44.161,22.082)
DQ12: R45.1 U1.B16 | length 17.5
  Top w0.064: U1.B16@24.719,20 26.193,20
  Top w0.127: 26.193,20 26.261,19.932 27.411,19.932 30.211,22.732 32.261,22.732 v2(32.211,22.682)
  Bottom w0.127: v2(32.211,22.682) 32.361,22.532 39.561,22.532 40.111,23.082 40.561,23.082 40.595,23.082 R45.1@40.605,23.092
DQ12_B: R45.2 U2.60 | length 7
  Top w0.127: v2(42.011,23.082) 43.861,23.082 44.011,22.932 45.061,21.882 45.061,20.632 45.318,20.375 U2.60@46.555,20.375
  Bottom w0.127: R45.2@41.405,23.092 42.001,23.092 v2(42.011,23.082)
DQ13: R47.1 U1.A18 | length 19.5
  Top w0.127: U1.A18@25.469,20.25 26.979,20.25 v2(27.661,20.932)
  Bottom w0.127: v2(27.661,20.932) 28.311,20.932 28.361,20.982 28.561,21.182 28.561,21.782 29.111,22.332 29.411,22.332 29.961,22.882 29.961,23.382 30.311,23.732 39.711,23.732 39.843,23.6 R47.1@42.814,23.6
DQ13_B: R47.2 U2.62 | length 4.1
  Top w0.127: v2(44.211,23.482) 44.611,23.482 cw(c44.586,23.307) 44.761,23.282 44.761,22.732 45.818,21.675 U2.62@46.555,21.675
  Bottom w0.127: R47.2@43.614,23.6 43.614,23.585 43.611,23.582 43.711,23.482 v2(44.211,23.482)
DQ14: R48.1 U1.B17 | length 17.5
  Top w0.064: U1.B17@24.719,20.5 26.729,20.5
  Top w0.127: 26.729,20.5 27.961,21.732 v2(28.011,21.732)
  Bottom w0.127: v2(28.011,21.732) 28.011,21.882 30.137,24.008 30.161,24.032 ; 30.111,23.982 30.161,24.032 ; R48.1@40.605,24.108 40.529,24.032 30.161,24.032
DQ14_B: R48.2 U2.63 | length 7.4
  Top w0.127: v2(42.011,24.132) 42.561,24.132 cw(c42.586,23.907) 42.811,23.932 42.811,23.732 ccw(c42.936,23.757) 42.961,23.632 43.411,23.632 ccw(c43.386,23.757) 43.511,23.782 43.511,23.932 cw(c43.661,23.982) 43.611,24.132 44.761,24.132 cw(c44.786,23.857) 45.061,23.882 45.061,22.882 45.618,22.325 U2.63@46.555,22.325
  Bottom w0.127: R48.2@41.405,24.108 41.431,24.082 42.061,24.082 v2(42.011,24.132)
DQ15: R49.1 U1.B18 | length 19.7
  Top w0.064: U1.B18@24.719,21 25.929,21
  Top w0.127: 25.929,21 27.661,22.732 v2(28.261,22.732)
  Bottom w0.127: v2(28.261,22.732) 28.261,22.882 29.711,24.332 39.711,24.332 39.995,24.616 R49.1@42.814,24.616
DQ15_B: R49.2 U2.65 | length 3.8
  Top w0.127: v2(44.111,24.682) 45.211,24.682 cw(c45.211,24.282) 45.611,24.282 45.611,23.732 ccw(c45.718,23.732) 45.718,23.625 U2.65@46.555,23.625
  Bottom w0.127: R49.2@43.614,24.616 43.68,24.682 v2(44.111,24.682)
ETH_GND: C45.2 R64.1 R65.2 R68.2 R71.1 | length 17.5
  Bottom w0.127: R64.1@20.081,36.904 20.083,36.904 R64.1@20.111,36.932 ; R71.1@26.354,36.954 26.354,36.932 R71.1@26.461,36.932 ; R65.2@30.849,36.993 30.861,36.993 R65.2@30.861,36.932 ; R68.2@33.362,37.043 33.473,36.932 R68.2@33.561,36.932
  Bottom w0.406: R64.1@20.111,36.932 R71.1@26.461,36.932 ; C45.2@36.407,37.597 36.407,36.932 35.792,36.932 35.507,36.932 33.561,36.932 30.861,36.932 30.811,36.932 R71.1@26.554,36.932 ; R71.1@26.461,36.932 R71.1@26.554,36.932 ; R71.1@26.461,36.932 R71.1@26.554,36.932
FB: C106.1 R99.1 R100.2 U5.5 | length 6.3
  Bottom w0.406: 6.388,37.705 R100.2@6.388,36.454 R99.1@6.388,35.615 C106.1@6.388,34.649 C106.1@6.411,34.649
  Bottom w0.5: U5.5@4.094,39.836 4.257,39.836 6.388,37.705
GND: AN1.GND C1.2 C2.2 C3.2 C4.1 C5.2 C7.2 C8.2 C9.1 C10.1 C11.1 C12.1 C13.1 C14.1 C15.2 C16.1 C17.1 C18.2 C20.1 C21.1 C24.2 C30.2 C31.2 C32.1 C35.1 C36.1 C37.1 C46.2 C47.2 C48.1 C49.2 C50.1 C51.1 C52.1 C53.2 C55.2 C57.1 C60.1 C61.2 C62.1 C63.1 C64.1 C65.2 C66.1 C67.1 C70.1 C71.1 C72.1 C73.2 C74.1 C75.2 C76.2 C77.1 C78.1 C79.2 C80.2 C81.1 C82.1 C83.2 C84.1 C85.1 C86.1 C87.2 C88.2 C89.2 C90.2 C91.1 C92.1 C93.1 C94.1 C95.1 C96.1 C97.2 C98.2 C99.1 C100.1 C101.1 C102.1 C103.2 C104.2 C105.2 C107.1 C108.1 C109.1 C110.2 C111.2 C112.2 C113.1 C114.2 C115.1 C119.2 D1.1 D2.1 GND.1 GND_CONTACTS.GND$1 GND_CONTACTS.GND$2 GND_CONTACTS.GND$3 L5.2 L11.1 R4.2 R7.2 R11.1 R12.1 R13.2 R15.1 R17.1 R20.2 R52.2 R53.1 R60.1 R61.2 R63.2 R92.1 R100.1 R103.2 R104.2 R110.2 R111.1 TPGND.1 U1.A74 U1.PAD U2.6 U2.12 U2.34 U2.48 U2.52 U2.58 U2.64 U2.66 U3.4 U5.2 U6.2 USB1.GND USB2.4 Y1.2 Y1.4 | length 38.2
  Top w0.127: v1(5.761,41.832) 6.023,42.094 C62.1@6.023,43.92 R92.1@6.023,43.031 ; R15.1@7.561,21.082 7.561,21.056 R15.1@7.589,21.056 ; U1.A74@17.85,11.131 17.85,9.943 v1(18.361,9.432) ; C48.1@18.811,25.382 18.811,25.355 C48.1@18.819,25.355 ; v1(32.261,13.982) 32.261,13.956 R52.2@32.854,13.956 ; U2.12@35.355,17.125 36.104,17.125 v1(36.661,17.582)
  Top w0.254: v1@4.011,15.882 4.011,15.645 4.822,15.645 5.411,15.645 C7.2@5.411,16.532
  Top w0.406: v1(7.411,21.632) 7.411,21.232 R15.1@7.561,21.082 ; v1(9.261,21.432) 9.367,21.326 R17.1@9.367,20.852 ; C52.1@17.849,25.336 18.811,25.336 C48.1@18.811,25.382 ; v1(18.361,9.432) 19.111,8.682 C61.2@19.111,8.314 19.379,8.314 v1(19.761,7.932) ; v5(23.261,41.382) 24.761,41.382 v5(24.861,41.482) 25.761,42.382 v5(25.761,44.432)
  Top w0.5: R12.1@20.7,5.25 20.7,5.2 21.3,5.2 21.759,5.2 R11.1@21.759,5.374
  Top w0.6: v1(15.911,47.682) v1(16.811,47.682)
  Top w1: 15.461,6.832 15.461,6.853 Y1.2@16.62,6.853 ; Y1.4@18.77,5.203 20.111,5.203 v1(20.111,5.532)
  Top w3: v1@18.6,15.55 18.6,16 U1.PAD@19.6,17
  Bottom w0.127: C97.2@11.611,20.482 11.611,20.425 C97.2@11.657,20.425 ; C3.2@17.161,20.382 17.161,20.332 C3.2@17.361,20.332
  Bottom w0.254: C2.2@11.561,21.282 11.561,20.482 C97.2@11.611,20.482
  Bottom w0.406: C82.1@16.521,14.914 17.261,14.914 v1(17.261,15.332) ; v1@17.311,19.282 v1(17.361,19.332) 17.361,20.332 17.41,20.381 C77.1@17.41,21.518 ; C105.2@20.762,23.169 21.711,23.169 21.711,23.219 C93.1@21.711,22.832
  Bottom w0.6: C109.1@7.111,32.332 7.111,33.69 TPGND.1@7.208,33.787
  Bottom w0.8: C110.2@2.411,29.482 3.361,29.482 C111.2@3.561,29.682
  Bottom w1.1: v1(3.061,6.832) 3.511,6.832 AN1.GND@3.511,5.782
  Bottom w2: v1(18.611,15.532) 18.611,16.011
  Bottom w3: 18.611,16.011 U1.PAD@19.6,17
  other v1: 28.661,1.282 30.561,1.632 35.461,2.782 45.461,3.382 38.561,3.532 32.011,3.782 15.511,4.382 21.961,4.382 47.761,4.382 13.861,4.482 25.061,4.482 11.611,4.532 20.111,4.732 21.161,4.782 14.211,6.282 15.411,6.382 47.761,6.432 5.261,6.532 3.961,6.832 11.311,6.932 15.461,7.282 12.861,7.432 34.061,7.882 37.361,7.882 42.961,7.882 40.761,7.982 14.761,8.032 15.661,8.082 4.311,8.382 1.211,8.482 11.561,8.482 7.161,8.732 14.711,8.882 17.161,9.082 42.461,9.182 36.661,9.232 38.661,9.232 34.011,9.332 28.661,9.382 29.861,9.382 32.011,9.382 25.161,9.482 26.261,9.482 47.761,9.582 45.011,9.882 10.561,9.982 8.261,10.032 12.511,10.132 5.911,10.232 39.861,10.582 31.961,10.632 38.011,10.632 43.011,10.632 34.011,10.682 28.561,10.782 29.761,10.782 24.961,10.932 13.661,11.082 25.811,11.182 4.711,11.282 27.461,11.282 3.311,11.932 1.111,12.032 42.561,12.132 44.561,12.182 5.411,12.532 47.761,12.532 19.511,12.782 3.111,12.932 4.161,12.982 1.111,13.032 41.611,13.132 38.361,13.182 39.761,13.332 47.811,13.332 15.161,13.782 28.761,14.032 45.261,14.132 1.111,14.332 42.311,14.332 19.961,14.632 21.311,14.632 22.761,14.632 40.311,14.732 47.761,15.182 38.511,15.232 43.011,15.532 21.161,15.782 3.861,15.882 9.361,15.882 3.111,15.932 40.411,16.132 44.811,16.182 47.811,16.182 1.111,16.232 10.211,16.232 17.211,16.232 24.061,16.232 22.261,16.632 17.211,17.482 39.211,17.532 21.911,17.582 2.961,17.632 1.061,17.732 40.661,17.782 44.811,17.982 6.611,18.032 37.711,18.082 3.861,18.332 17.311,18.332 42.711,18.332 18.311,18.382 20.561,18.632 6.861,18.732 47.711,19.032 12.011,19.282 3.961,19.332 18.461,19.432 19.411,19.432 22.711,19.432 39.011,19.432 21.261,19.482 1.061,19.682 42.961,19.932 4.511,19.982 5.311,20.232 47.761,20.232 11.011,20.382 3.661,20.832 36.561,21.032 39.811,21.032 31.511,21.082 10.911,21.432 1.111,21.532 25.961,21.832 12.511,22.082 3.411,22.382 10.961,22.432 26.711,22.582 24.511,22.682 1.161,22.782 47.811,22.982 33.361,23.132 38.461,23.132 9.561,23.232 30.561,23.232 31.811,23.232 4.011,23.332 10.411,23.482 12.561,23.482 25.011,23.482 2.311,23.532 18.161,23.532 28.661,24.182 10.611,24.582 15.661,24.632 19.061,24.632 1.761,24.682 27.111,24.682 27.911,24.832 25.261,24.882 28.811,24.932 33.161,24.932 38.461,24.932 46.711,24.982 35.211,25.132 40.761,25.132 30.261,25.382 1.761,25.482 12.611,25.632 16.311,25.882 17.111,25.882 10.911,25.932 37.611,26.132 22.611,26.482 35.061,26.632 13.911,26.832 11.611,26.882 18.161,26.882 28.511,26.982 39.961,27.032 1.211,27.432 18.011,27.732 14.561,27.782 28.561,28.032 12.361,28.582 3.311,29.282 4.061,29.332 36.461,29.332 15.361,29.482 16.111,29.482 27.261,29.482 20.861,29.532 25.761,29.532 23.411,29.582 1.561,29.682 19.361,29.682 4.911,30.032 17.861,30.282 21.161,30.982 23.411,30.982 25.911,30.982 13.211,31.032 14.661,31.032 38.511,31.232 18.861,31.332 28.861,31.382 42.261,31.382 17.561,32.032 1.261,32.532 43.211,32.582 28.811,32.932 23.411,32.982 17.961,33.032 19.461,33.032 21.261,33.032 26.111,33.032 31.961,33.032 34.911,33.032 14.261,33.182 7.611,33.232 6.861,33.282 38.311,33.382 14.911,33.832 39.861,33.932 17.061,34.282 7.011,34.582 12.861,34.982 44.211,35.182 1.261,35.332 4.611,35.582 14.661,35.782 3.461,36.482 46.161,36.482 16.361,36.532 7.111,36.582 14.011,36.732 13.111,36.782 5.661,37.182 44.411,37.332 1.261,37.532 14.911,37.582 16.311,37.782 2.911,38.132 6.711,38.432 5.611,39.532 1.211,40.082 12.011,40.082 4.511,40.632 15.961,40.732 3.611,40.782 46.061,40.882 12.411,41.032 44.111,41.082 1.161,42.032 15.011,42.182 17.511,42.682 19.211,42.882 15.761,43.132 15.811,44.332 3.661,44.432 14.761,44.432 3.711,45.082 3.211,45.882 10.061,47.582
  other v2: 11.961,12.832 8.161,12.882 9.411,12.882 12.461,14.982 24.161,17.182 21.761,23.532
  other v3: 34.361,1.282 38.111,1.332 41.811,1.332 44.961,1.482 41.711,3.632 10.211,4.632 7.261,6.682 1.211,6.732 1.211,10.232 45.261,25.632 31.961,27.032 47.761,27.532 42.761,27.632 41.461,28.782 45.211,28.832 30.561,29.182 33.261,29.182 39.361,29.482 31.861,31.082 47.761,31.082 36.461,31.232 40.511,31.482 45.011,33.382 36.661,34.382 47.761,34.632 39.861,34.932 38.111,35.932 47.611,38.082 47.611,41.382 47.561,44.732 44.611,47.532
  other v5: 24.061,19.532 15.861,23.632
GPIO0: R4.1 U1.A78 | length 8.2
  Top w0.127: U1.A78@19.85,11.131 19.85,10.043 23.961,5.932 23.961,5.14 R4.1@23.579,4.758